# Altium PCB HCD_PCB.PcbDoc (part 1 of 4)
Units mil, origin at the board's own origin, x right, y up, seen from the top; angles counter-clockwise.
Board outline 2762.03 x 3428.03 mil, 2 copper layers (Top Layer, Bottom Layer), stack 57 mil thick; 112 components, 73 nets, 363 pads, 145 vias.
Unrouted connection lines stored in the file: 1.
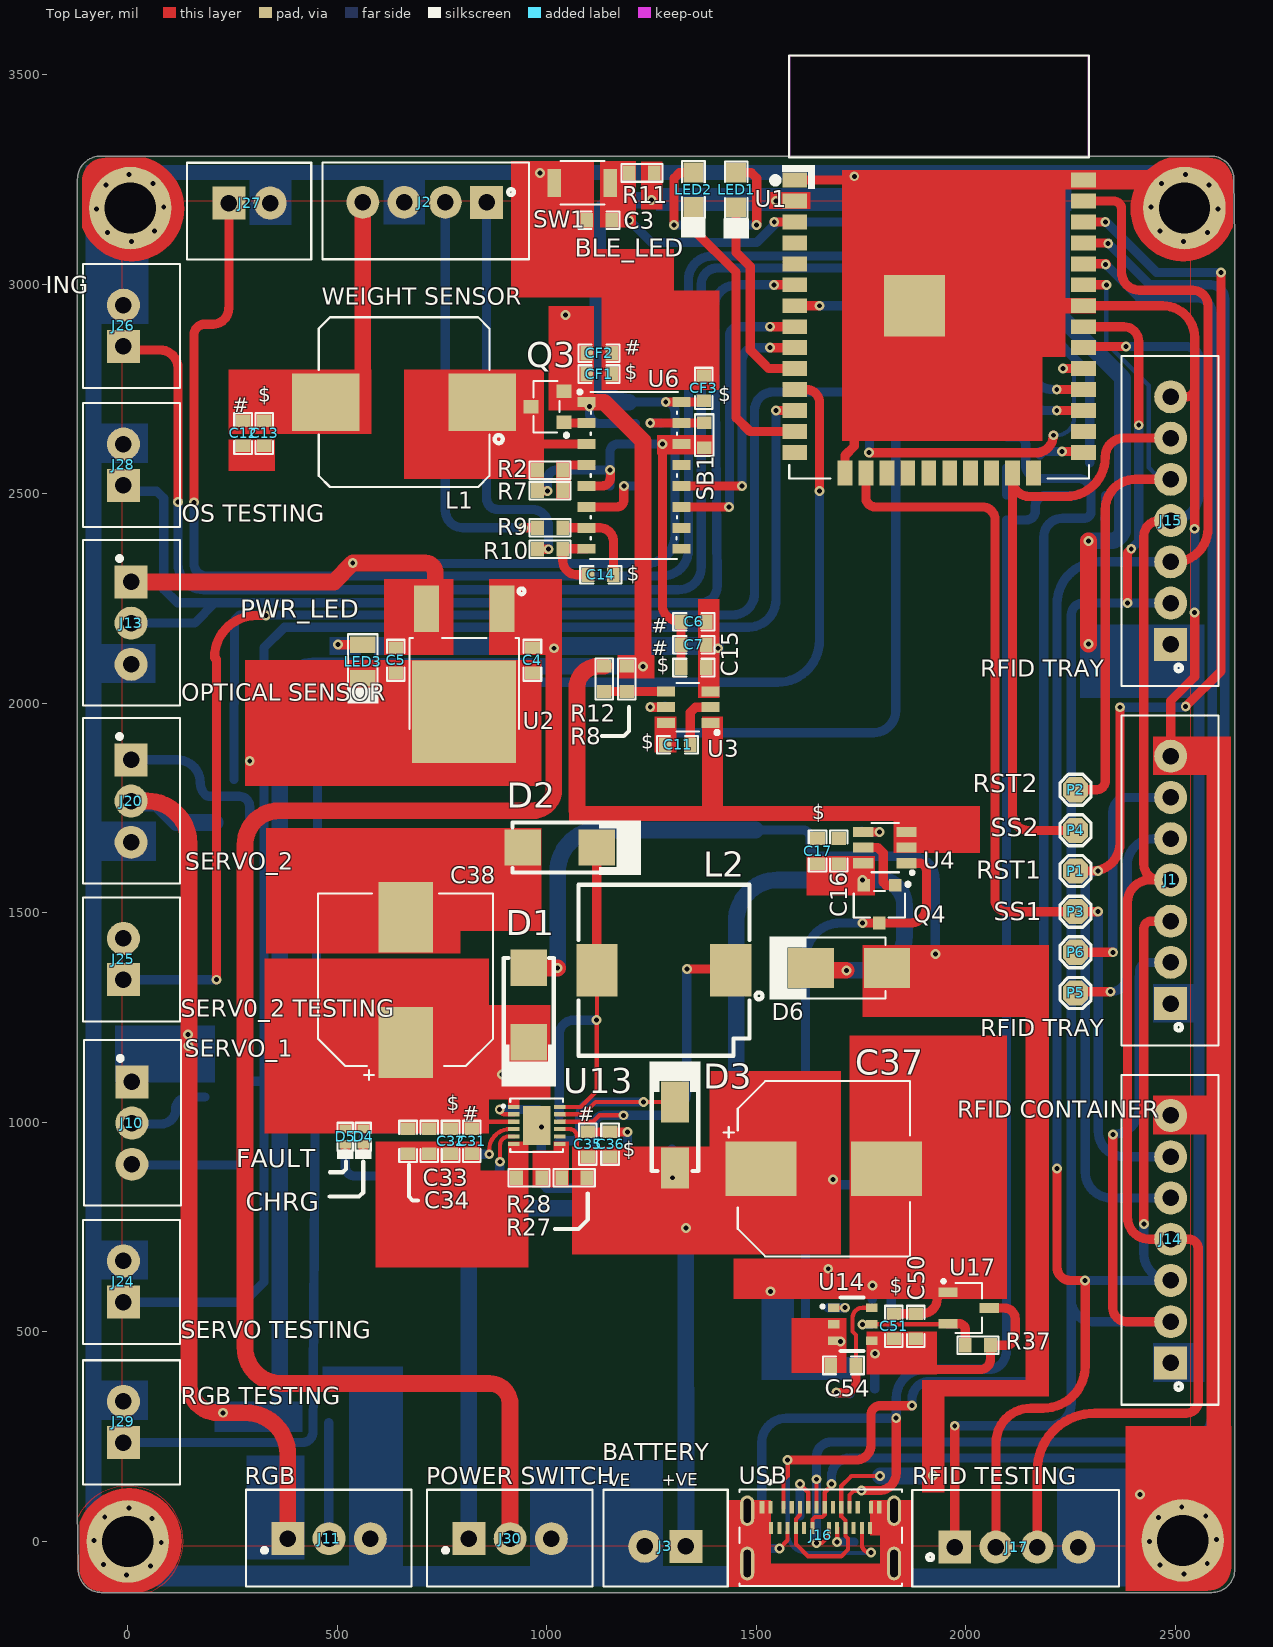
[diagram p0: Top Layer view]
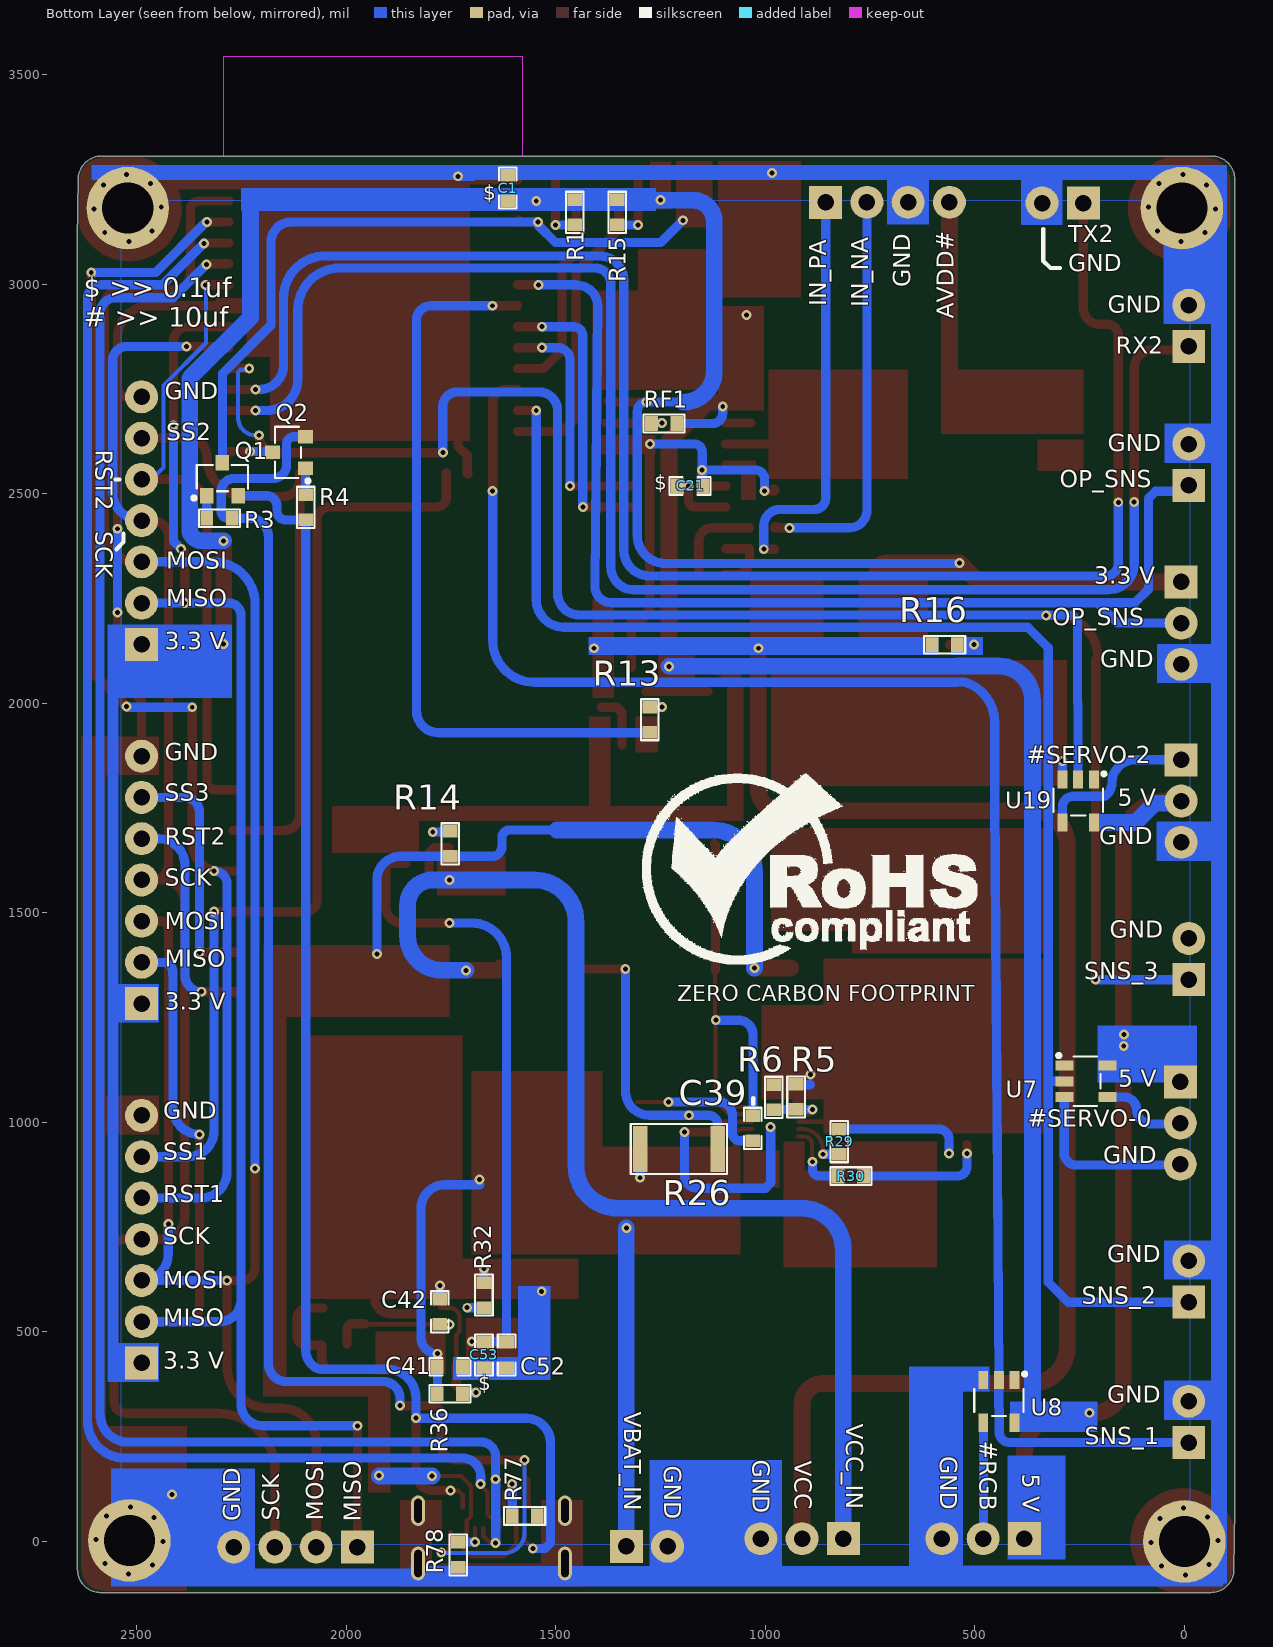
[diagram p1: Bottom Layer view, seen from below]
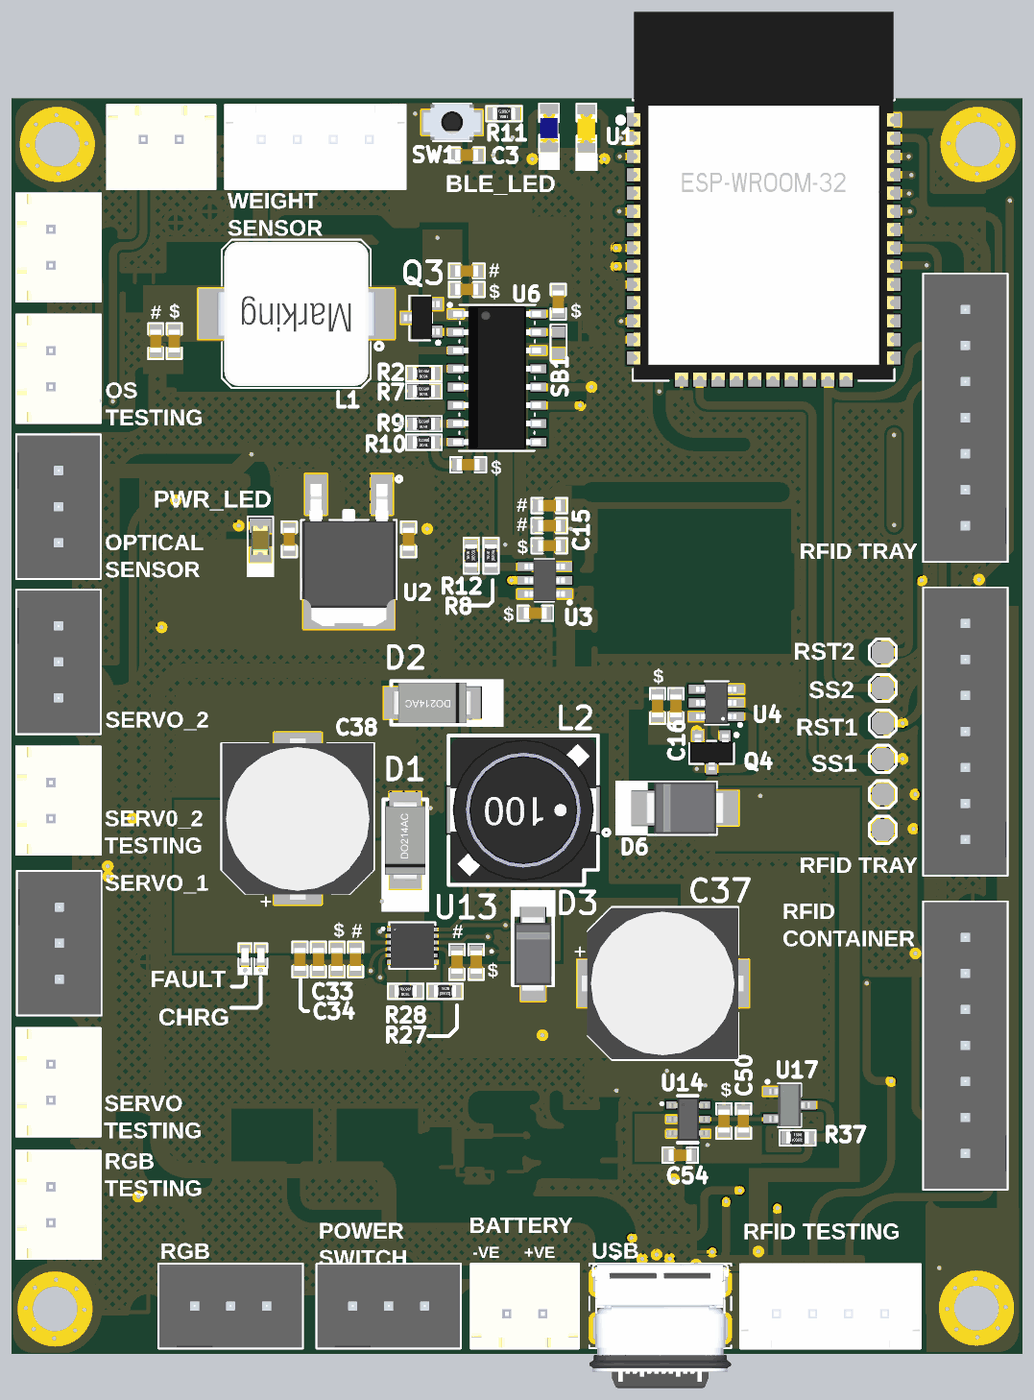
[diagram p3: 3D render of the assembled board from above, using the file's embedded part models]
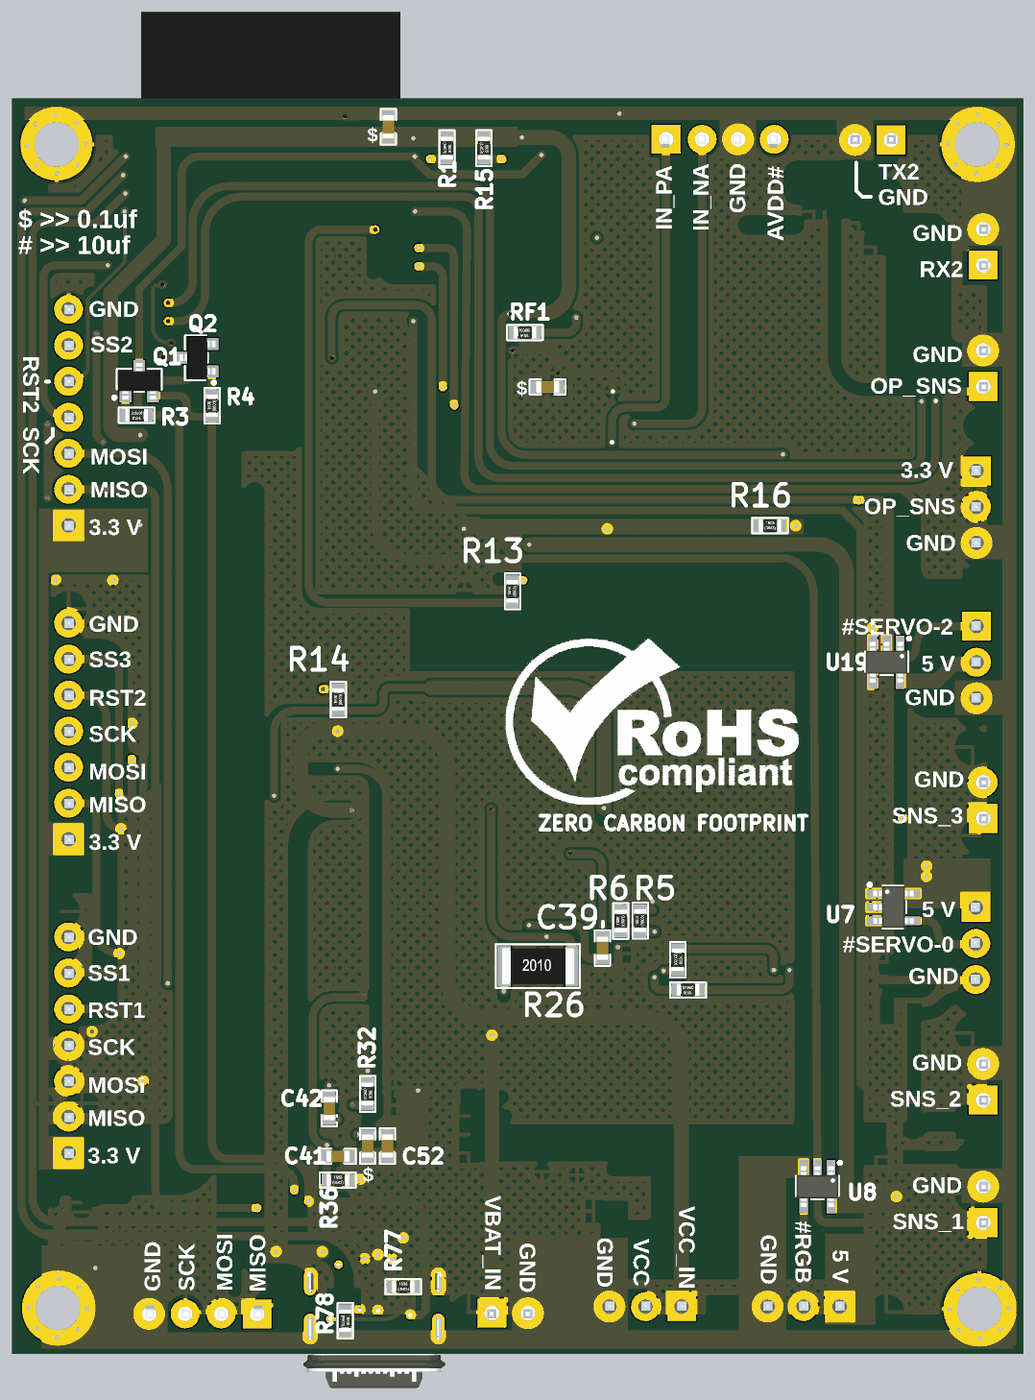
[diagram p4: 3D render of the assembled board from below, using the file's embedded part models]

## Layer stack, top to bottom
Top Solder: solder mask 3, Solder Resist, Dk 3.5
Top Layer: signal copper 10
Dielectric 1: dielectric 37, FR-4, Dk 4.8
Bottom Layer: signal copper 10
Bottom Solder: solder mask 3, Solder Resist, Dk 3.5

## Board outline
-118.02,-67 cw(c-113,-67) -117.99,-66.5 cw(c-113,-66) -118.01,-66.07 -120.01,75.92 cw(c-115,76) -120.01,75.93 -120.01,75.92 -120.01,75.93 cw(c-115,76) -120.02,76 -120.02,3251 cw(c-65,3251) -65,3306.02 2585,3306.02 cw(c2585,3251) 2639.94,3253.86 cw(c2635,3253) 2640.01,3253.05 2642.01,3108.08 2642.01,3108.07 2642.01,3108.08 cw(c2637,3108) 2642.01,3108 2642.01,-67 2642.02,-67 ccw(c2637,-67) 2642.01,-66.97 2642.02,-67 cw(c2587,-67) 2587,-122.02 cw(c2587,-117) 2586,-121.91 cw(c2585,-117) 2585,-122.02 -63,-122.02 cw(c-63,-67)

## Design rules (kind name [scope] priority, off if disabled: settings)
Clearance [All] p1: gap=7 ignorepadtopadclearanceinfootprint=FALSE except(0: Arc-Hole Track-Hole SMDPad-Hole THPad-Hole Via-Hole Fill-Hole Poly-Hole Region-Hole Text-Hole; 3: Arc-SMDPad Track-SMDPad SMDPad-SMDPad)
HoleSize [All] p1: absolutevalues=TRUE maxlimit=200 minlimit=1 maxpercent=80.000 minpercent=20.000
HoleToHoleClearance [All] p1: gap=0 allowstackedmicrovias=TRUE
MinimumSolderMaskSliver [All] p1: minsoldermaskwidth=0
PolygonConnect [All] p1: connectstyle=Relief reliefconductorwidth=10 reliefentries=4 polygonreliefangle="90 Angle" airgapwidth=10
RoutingVias [All] p1: holewidth=11.81 width=23.62 viastyle="Through Hole" minholewidth=11.81 minwidth=23.62 maxholewidth=11.81 maxwidth=23.62
SilkToSilkClearance [All] p1: silktosilkclearance=0
SilkToSolderMaskClearance [IsPad] p1: minsilkscreentomaskgap=0 clearancetoexposedcopper=TRUE
SolderMaskExpansion [All] p1: expansion=4 istentingtop=FALSE
Width [All] p1: maxlimit=40 minlimit=10 preferedwidth=22
25 further rules are at their usual default settings.

## Classes and differential pairs
component class U_MCU_Power_Section: C4 C5 LED3 R16 U2
component class U_Sensor_Section: J1 J10 J11 J14 J15 J17 J20 J24 J25 J29 P1 P2 P3 P4 P5 P6 U7 U8 U19
component class U_Buck_Regulator_Section: C6 C7 C11 C15 C16 C17 D6 Q4 R8 R12 R13 R14 U3 U4
component class U_LiFePo_Charging_Section: C31 C32 C33 C34 C35 C36 C37 C38 C39 D1 D2 D3 D4 D5 L2 R5 R6 R26 R27 R28 R29 R30 U13
component class U_Controller_Section: C1 C3 LED1 LED2 Q1 Q2 R1 R3 R4 R11 R15 SW1 U1
component class U_Connector_Section: J3 J16 J30 R77 R78
component class U_Battery_Management_Section: C41 C42 C50 C51 C52 C53 C54 R32 R36 R37 U14 U17
component class U_Actuator_Section: C12 C13 C14 C21 CF1 CF2 CF3 J2 L1 Q3 R2 R7 R9 R10 RF1 SB1 U6
component class U_Actuator_Section2: J13 J26 J27 J28

## Components (designator, comment, footprint, x,y, rotation, side; value= is the part's Value field where it differs from the comment)
C1 "0.1uF" CAP-0603 1615,3230 r90 bottom
C3 "1uF" CAP-0603 1125,3153 r180 top
C4 "1uF" CAP-0603 966,2103 r270 top
C5 "2.2uF" CAP-0603 640,2103 r270 top
C6 "10uF" CAP-0603 1351,2195 r180 top
C7 "10uF" CAP-0603 1351,2140.25 r180 top
C11 "0.1uF" CAP-0603 1312.38,1901 r180 top
C12 "10uF" CAP-0603 275.15,2644.49 r270 top
C13 "0.1uF" CAP-0603 325.7,2644.49 r270 top
C14 "0.1uF" CAP-0603 1129,2307 r180 top
C15 "0.1uF" CAP-0603 1351,2085.5 r180 top
C16 "1uF" CAP-0603 1696.72,1647.61 r90 top
C17 "0.1uF" CAP-0603 1646.22,1647.61 r90 top
C21 "0.1uF" CAP-0603 1180,2519 r0 bottom
C31 "10uF" CAP-0603 821,955 r270 top
C32 "0.1uF" CAP-0603 770.33,955 r270 top
C33 "4.7uF" CAP-0603 719.67,955 r270 top
C34 "4.7uF" CAP-0603 669,955 r270 top
C35 "10uF" CAP-0603 1098,948 r90 top
C36 "0.1uF" CAP-0603 1151,948 r90 top
C37 "470uF" UCD1E471MNL1GS 1661.39,889.43 r0 top
C38 "470uF" UCD1E471MNL1GS 663,1340 r90 top
C39 "1uF" CAP-0603 1030,986 r90 bottom
C41 "1uF" CAP-0603 1753,417 r180 bottom
C42 "1nF" CAP-0603 1777,548 r90 bottom
C50 "1uF" CAP-0603 1881,513.46 r90 top
C51 "0.1uF" CAP-0603 1828,513.46 r90 top
C52 "1uF" CAP-0603 1617.86,445 r270 bottom
C53 "0.1uF" CAP-0603 1671.86,445 r270 bottom
C54 "1nF" CAP-0603 1708,420 r0 top
CF1 "0.1uF" CAP-0603 1125,2786 r0 top
CF2 "10uF" CAP-0603 1125,2836 r0 top
CF3 "0.1uF" CAP-0603 1375,2752 r90 top
D1 "CMSH3-40MA TR13 PBFREE" DO-214AC 957,1280 r90 top
D2 "CMSH3-40MA TR13 PBFREE" DO-214AC 1030.97,1656 r180 top
D3 "S1A-13-F" SMA 1306,970 r270 top
D4 "XZVG68W-2" "LED 0402" 562,966.28 r270 top
D5 "XZVG68W-2" "LED 0402" 519,966.28 r270 top
D6 "SS54B-HF" SMB 1721.55,1368.58 r180 top
J1 "RFID Tray" B7B-XH-A(LF)(SN) 2489,1578.77 r90 top
J2 "Weight Sensor" B4B-XH-A(LF)(SN) 708.64,3196 r180 top
J3 "B2B-XH-A(LF)(SN)" B2B-XH-A(LF)(SN) 1283,-11.66 r180 top
J10 "WS2812B" B3B-XH-A(LF)(SN) 10,998.57 r270 top
J11 "WS2812B" B3B-XH-A(LF)(SN) 480.57,6.53 r0 top
J13 "Optical Sensor" B3B-XH-A(LF)(SN) 8,2191.57 r270 top
J14 "RFID Container" B7B-XH-A(LF)(SN) 2489,721.26 r90 top
J15 "RFID Tray" B7B-XH-A(LF)(SN) 2489,2436.28 r90 top
J16 "2305018-2" 2305018-2 1653.74,14.28 r0 top locked
J17 "B4B-XH-A(LF)(SN)" B4B-XH-A(LF)(SN) 2121.36,-13.39 r0 top
J20 "WS2812B" B3B-XH-A(LF)(SN) 8,1767 r270 top
J24 "B2B-XH-A(LF)(SN)" B2B-XH-A(LF)(SN) -10.19,620.21 r90 top
J25 "B2B-XH-A(LF)(SN)" B2B-XH-A(LF)(SN) -10.19,1389.79 r90 top
J26 "B2B-XH-A(LF)(SN)" B2B-XH-A(LF)(SN) -10.19,2901.21 r90 top
J27 "B2B-XH-A(LF)(SN)" B2B-XH-A(LF)(SN) 290.79,3194.19 r0 top
J28 "B2B-XH-A(LF)(SN)" B2B-XH-A(LF)(SN) -10.19,2569.79 r90 top
J29 "B2B-XH-A(LF)(SN)" B2B-XH-A(LF)(SN) -10.19,285.21 r90 top
J30 "B3B-XH-A(LF)(SN)" B3B-XH-A(LF)(SN) 912.57,6.53 r0 top
L1 "3.3uH" 74437368033 659.43,2719 r180 top
L2 "10uH" SLF10145T-100M2R5-PF 1279.55,1363 r180 top
LED1 "LTST-C170KSKT" LTST-C170KSKT 1452,3225.34 r270 top
LED2 "17-21/BHC-XL2M2TY/3T" 17-21/BHC-XL2M2TY/3T 1350,3226 r270 top
LED3 "LTST-C171KGKT" "LED 0805" 561,2100 r270 top
P1 "Test Point" "Test point" 2262,1600 r90 top
P2 "Test Point" "Test point" 2262,1794 r90 top
P3 "Test Point" "Test point" 2262,1503 r90 top
P4 "Test Point" "Test point" 2262,1697 r90 top
P5 "Test Point" "Test point" 2262,1309 r0 top
P6 "Test Point" "Test point" 2262,1406 r0 top
Q1 "MMBT2222A-7-F" sot-23 2296,2535 r180 bottom
Q2 "MMBT2222A-7-F" sot-23 2137,2599 r90 bottom
Q3 "MMBT4403LT1G" sot-23 1002,2708 r90 top
Q4 "FDN306P" SuperSOT-3 1794,1521 r180 top
R1 "100R" RES-0603 1455,3172 r90 bottom
R2 "20K" RES-0603 1008,2556.07 r0 top
R3 "10K" RES-0603 2303,2442 r180 bottom
R4 "10K" RES-0603 2097,2468 r270 bottom
R5 "301k" RES-0603 927,1061 r270 bottom
R6 "100K" RES-0603 980,1060 r270 bottom
R7 "8.2K" RES-0603 1008,2508 r0 top
R8 "54.9K" RES-0603 1191,2058.4 r270 top
R9 "100R" RES-0603 1008,2419 r0 top
R10 "100R" RES-0603 1008,2368 r0 top
R11 "10K" RES-0603 1227,3266 r0 top
R12 "10K" RES-0603 1137,2058.4 r270 top
R13 "10K" RES-0603 1276,1961 r270 bottom
R14 "470K" RES-0603 1752,1665 r270 bottom
R15 "100R" RES-0603 1354,3172 r90 bottom
R16 "470R" RES-0603 572.17,2140.25 r0 bottom
R26 "0.05R" "RES 2010" 1206.48,936.48 r180 bottom
R27 "536K" RES-0603 1065.61,868 r180 top
R28 "453K" RES-0603 957.91,868 r0 top
R29 "5.1K" RES-0603 824,954 r90 bottom
R30 "5.1K" RES-0603 796,872 r180 bottom
R32 "10K" RES-0603 1671.86,587.82 r90 bottom
R36 "100K" RES-0603 1753,352.16 r0 bottom
R37 "100K" RES-0603 2029,468 r180 top
R77 "5.1K" RES-0603 1574.53,60.85 r0 bottom
R78 "5.1K" RES-0603 1733,-32 r90 bottom
RF1 "10K" RES-0603 1242,2668 r180 bottom
SB1 "Solder Bridge" "Solder Bridge" 1376,2640 r270 top
SW1 "B3U-1000P" B3U-1000P 1085,3242 r180 top
U1 "ESP32-WROOM-32D (8MB)" "ESP32-WROOM-32D (8MB)" 1936.51,2899.39 r0 top
U2 "LDF33DT-TR" LDF33DT-TR 803,2103 r180 top
U3 "TPS565208DDCT" "SOT 23-6" 1338,1991 r180 top
U4 "LTC4412IS6#TRPBF" TSOT-23-6 1807,1656 r180 top
U6 "HX711" HX711 1208,2544 r0 top
U7 "SN74LV1T34DBVR" SOT-23-5 235,1098 r180 bottom
U8 "SN74LV1T34DBVR" SOT-23-5 442.82,334.43 r270 bottom
U13 "LT3652EDD#PBF" LT3652EDD#PBF 976.12,992.86 r0 top
U14 "SI3865DDV-T1-GE3" 6-TSOP 1730.23,518.41 r0 top
U17 "BD48K50G-TL" SSOP-3 2006.98,557 r270 top
U19 "SN74LV1T34DBVR" SOT-23-5 253.8,1767 r270 bottom

## Footprints (in the part's own frame and the unit in brackets; to place one, negate y for a bottom-side part, rotate by r counter-clockwise, add the part's x,y. Pads: shape width x height; smd on the part's side, far side on the other; paste and mask are expansions set on the pad)
6-TSOP [mil]
  rect 27.52x20 smd: 1(-45.77,39.41) 2(-45.77,0) 3(-45.77,-39.41) 4(45.77,-39.41) 5(45.77,0) 6(45.77,39.41)
  silkscreen extent -74,-64 26,64, body extent -53,-59 53,59, height 39
17-21/BHC-XL2M2TY/3T [mm] "Blue 0805 Light Emitting Diodes (LED) ROHS"
  rect 1.2x1.2 smd: 1(-1.05,0) 2(1.05,0)
  silkscreen extent -1.73,-0.74 2.9,0.74, body extent -1,-0.62 1,0.63, height 1.1
2305018-2 [mm]
  rect 0.25x0.75 smd: A1(-3.05,1.7) A2(-2.25,1.7) A3(-1.75,1.7) A4(-1.25,1.7) A5(-0.75,1.7) A6(-0.25,1.7) A7(0.25,1.7) A8(0.75,1.7) A9(1.25,1.7) A10(1.75,1.7) A11(2.25,1.7) A12(3.05,1.7) B1(3,0.45) B2(2.5,0.45) B3(2,0.45) B4(1.5,0.45) B5(1,0.45) B6(0.5,0.45) B7(-0.5,0.45) B8(-1,0.45) B9(-1.5,0.45) B10(-2,0.45) B11(-2.5,0.45) B12(-3,0.45)
  rect 0.3x0.75 smd: G1(-3.55,1.7) G2(3.55,1.7)
  oval 0.85x2.05 hole 0.45 slot 1.65 at 90 deg: S1(-4.45,-1.7) S2(4.45,-1.7)
  oval 0.85x1.85 hole 0.45 slot 1.45 at 90 deg: S3(4.45,1.5) S4(-4.45,1.5)
  silkscreen extent -4.92,-3.07 4.92,3.33, body extent -4.92,-5.86 4.92,2.79, height 3.53
74437368033 [mm]
  rect 4.1x3.5 smd: 1(-4.75,0) 2(4.75,0)
  silkscreen extent -5.99,-5.15 5.17,5.15, body extent -5.5,-5 5.5,5, height 3.7
B2B-XH-A(LF)(SN) [mm]
  rect 2x2 hole 1: 1(-1.25,0)
  round 2 hole 1: 2(1.25,0)
  silkscreen extent -3.78,-3.43 3.74,2.44, body extent -3.72,-3.37 3.68,2.38, height 7
B3B-XH-A(LF)(SN) [mm]
  rect 2x2 hole 1: 1(-2.5,0)
  round 2 hole 1: 2(0,0) 3(2.5,0)
  silkscreen extent -5.03,-2.9 4.99,2.97, body extent -4.97,-2.84 4.93,2.91, height 7
B3U-1000P [mm] "SWITCH TACTILE SPST-NO 0.05A 12V"
  rect 0.82x1.72 smd: 1(-1.7,0) 2(1.7,0)
  silkscreen extent -1.35,-1.32 1.32,1.3, body extent -2,-1.26 2,1.24, height 1.6
B4B-XH-A(LF)(SN) [mm]
  rect 2x2 hole 1: 1(-3.75,0)
  round 2 hole 1: 2(-1.25,0) 3(1.25,0) 4(3.75,0)
  silkscreen extent -6.32,-2.4 6.2,3.45, body extent -6.26,-2.35 6.14,3.4, height 7
B7B-XH-A(LF)(SN) [mm]
  rect 2x2 hole 1: 1(-7.5,0)
  round 2 hole 1: 2(-5,0) 3(-2.5,0) 4(0,0) 5(2.5,0) 6(5,0) 7(7.5,0)
  silkscreen extent -10.03,-2.9 9.97,2.97, body extent -9.97,-2.84 9.93,2.91, height 7
CAP-0603 [mil]
  rect 30x35 smd mask+2.36: 1(-30,0) 2(30,0)
  silkscreen extent -49,-21 49,21, body extent -32,-16 31,16, height 34
DO-214AC [mm]
  rect 2.21x2.2 smd: 1(-2.25,0) 2(2.25,0)
  silkscreen extent -4.93,-1.65 2.86,1.65, body extent -2.74,-1.4 2.74,1.4, height 2.24
"ESP32-WROOM-32D (8MB)" [mm]
  rect 1.5x0.9 smd: 1(-8.75,8.88) 2(-8.75,7.61) 3(-8.75,6.34) 4(-8.75,5.07) 5(-8.75,3.8) 6(-8.75,2.53) 7(-8.75,1.26) 8(-8.75,-0.01) 9(-8.75,-1.28) 10(-8.75,-2.55) 11(-8.75,-3.82) 12(-8.75,-5.09) 13(-8.75,-6.36) 14(-8.75,-7.63) 25(8.75,-7.63) 26(8.75,-6.36) 27(8.75,-5.09) 28(8.75,-3.82) 29(8.75,-2.55) 30(8.75,-1.28) 31(8.75,-0.01) 32(8.75,1.26) 33(8.75,2.53) 34(8.75,3.8) 35(8.75,5.07) 36(8.75,6.34) 37(8.75,7.61) 38(8.75,8.88)
  rect 0.9x1.5 smd: 15(-5.71,-8.88) 16(-4.44,-8.88) 17(-3.17,-8.88) 18(-1.9,-8.88) 19(-0.63,-8.88) 20(0.64,-8.88) 21(1.91,-8.88) 22(3.18,-8.88) 23(4.45,-8.88) 24(5.72,-8.88)
  rect 3.7x3.7 smd: 39(-1.5,1.26)
  Keep-Out Layer region: -9.042,10.287 9.042,10.287 9.042,16.383 -9.042,16.383
  silkscreen extent -10.06,-9.22 9.09,16.43, body extent -9.04,-9.16 9.04,16.38, height 3
HX711 [mm]
  rect 1.1x0.6 smd: 1(-2.875,4.445) 2(-2.875,3.175) 3(-2.875,1.905) 4(-2.875,0.635) 5(-2.875,-0.635) 6(-2.875,-1.905) 7(-2.875,-3.175) 8(-2.875,-4.445) 9(2.875,-4.445) 10(2.875,-3.175) 11(2.875,-1.905) 12(2.875,-0.635) 13(2.875,0.635) 14(2.875,1.905) 15(2.875,3.175) 16(2.875,4.445)
  silkscreen extent -3.37,-5.06 2.67,5.15, body extent -3.04,-5 3.04,5, height 1.62
LDF33DT-TR [mm]
  rect 1.5x2.8 smd: 1(-2.286,-3.125) 3(2.286,-3.125)
  rect 6.3x6.2 smd: 2(0,3.125)
  silkscreen extent -3.65,-4.36 3.32,4.16, body extent -3.27,-3.84 3.27,6.03, height 2.4
"LED 0402" [mm] "LED BLUE CLEAR CHIP SMD"
  rect 0.5x0.7 smd: 1(-0.47,0) 2(0.47,0)
  silkscreen extent -0.84,-0.51 1.37,0.51, body extent -0.5,-0.25 0.5,0.25, height 0.5
"LED 0805" [mil] "SMD 0805"
  rect 40x60 smd: 1(-40,0) 2(40,0)
  silkscreen extent -65,-37 100,37, body extent -40,-25 40,25, height 43
LT3652EDD#PBF [mm]
  rect 0.7x0.25 smd: 1(-1.4,1.125) 2(-1.4,0.675) 3(-1.4,0.225) 4(-1.4,-0.225) 5(-1.4,-0.675) 6(-1.4,-1.125) 7(1.4,-1.125) 8(1.4,-0.675) 9(1.4,-0.225) 10(1.4,0.225) 11(1.4,0.675) 12(1.4,1.125)
  rect 1.65x2.38 smd: 13(0,0)
  silkscreen extent -2.05,-1.62 1.6,1.62, body extent -1.55,-1.55 1.55,1.55, height 0.8
LTST-C170KSKT [mm] "Yellow 0805 Light Emitting Diodes (LED) ROHS"
  rect 1.2x1.2 smd: 1(-1.05,0) 2(1.05,0)
  silkscreen extent -1.73,-0.76 2.95,0.77, body extent -1,-0.62 1,0.63, height 1.1
"RES 2010" [mm] "RES 50M OHM 1% 3/4W 2010"
  rect 0.9x2.8 smd: 1(-2.35,0) 2(2.35,0)
  silkscreen extent -2.92,-1.52 2.92,1.52, body extent -2.5,-1.25 2.5,1.25, height 0.6
RES-0603 [mil]
  rect 30x35 smd: 1(-30,0) 2(30,0)
  silkscreen extent -49,-21 49,21, body extent -31,-17 31,17, height 18
SLF10145T-100M2R5-PF [mm]
  rect 2.5x3.2 smd: 1(-4.05,0) 2(4.05,0)
  silkscreen extent -5.98,-5.18 5.18,5.18, body extent -5.06,-5.05 5.06,5.05, height 4.5
SMA [mm]
  rect 2.5x1.7 smd: 1(-2,0) 2(2,0)
  silkscreen extent -4.44,-1.55 2.19,1.55, body extent -2.6,-1.3 2.6,1.3, height 2.4
SMB [mm]
  rect 2.8x2.4 smd: 1(-2.3,0) 2(2.3,0)
  silkscreen extent -2.21,-1.9 4.83,1.91, body extent -2.7,-1.8 2.7,1.8, height 2.3
"Solder Bridge" [mil] "Solder Bridge ON"
  rect 30x35 smd: 1(-30,0) 2(30,0)
  silkscreen extent -50,-22 50,22
"SOT 23-6" [mm]
  rect 1.1x0.6 smd: 1(-1.35,0.95) 2(-1.35,0) 3(-1.35,-0.95) 4(1.35,-0.95) 5(1.35,0) 6(1.35,0.95)
  silkscreen extent -1.83,-1.47 0.7,1.63, body extent -1.4,-1.45 1.4,1.45, height 1.1
sot-23 [mm]
  rect 0.82x0.92 smd: 1(-0.95,-1) 2(0.95,-1) 3(0,1)
  silkscreen extent -1.82,-1.23 1.56,0.86, body extent -1.5,-1.25 1.5,1.25, height 1.1
SOT-23-5 [mm]
  rect 1.1x0.6 smd: 1(-1.3,0.95) 2(-1.3,0) 3(-1.3,-0.95) 4(1.3,-0.95) 5(1.3,0.95)
  silkscreen extent -1.74,-1.5 0.88,1.65, body extent -1.4,-1.45 1.4,1.45, height 1.45
SSOP-3 [mm]
  rect 0.59x1.17 smd: 1(-0.95,-1.25) 2(0.95,-1.25) 3(0,1.25)
  silkscreen extent -1.73,-1.62 1.51,0.8, body extent -1.46,-1.4 1.46,1.4, height 1.25
SuperSOT-3 [mm]
  rect 0.76x0.76 smd: 1(-0.95,-1.145) 2(0.95,-1.145) 3(0,1.145)
  silkscreen extent -1.82,-1.29 1.56,0.81, body extent -1.5,-1.25 1.5,1.25, height 1.1
"Test point" [mil]
  oct 60x60 smd: 1(0,0)
  silkscreen extent -37,-37 37,37
TSOT-23-6 [mm]
  rect 1.22x0.62 smd: 1(-1.31,0.95) 2(-1.31,0) 3(-1.31,-0.95) 4(1.31,-0.95) 5(1.31,0) 6(1.31,0.95)
  silkscreen extent -1.73,-1.5 0.81,1.6, body extent -1.4,-1.45 1.4,1.45, height 1
UCD1E471MNL1GS [mm]
  rect 4.3x3.3 smd: 1(-3.8,0) 2(3.8,0)
  silkscreen extent -6.07,-5.31 5.23,5.31, body extent -5.63,-5.24 5.58,5.24, height 10.54

## Part data
C1 C11 C13 C14 C17 C21 C32 C36 C51 C53 CF1 CF3: library part CL10B104KB8NNNL, "CAP CER 0.1UF 50V X7R 0603", Capacitance=100nF, Case/Package=0603, Dielectric=X7R, Manufacturer=Samsung, Max Operating Temperature=125°C, Min Operating Temperature=-55°C, Package Quantity=15000, Supplier Part Number 1=1276-CL10B104KB8NNNLCT-ND, Tolerance=10%, Voltage Rating=50V, ComponentLink1Description=https://www.verical.com/server-webapp/html/getDatasheet?partID=357523&src-supplier=Verical, ComponentLink1URL=https://www.verical.com/server-webapp/html/getDatasheet?partID=357523&src-supplier=Verical, ComponentLink2Description=https://media.digikey.com/pdf/Data%20Sheets/Samsung%20PDFs/CL_Series_MLCC_ds.pdf?src-supplier=Digi-Key, ComponentLink2URL=https://media.digikey.com/pdf/Data%20Sheets/Samsung%20PDFs/CL_Series_MLCC_ds.pdf?src-supplier=Digi-Key, Construction=Flat, Depth=0.8mm, Height=0.8mm, Length=1.6mm, Manufacturer Part Number=CL10B104KB8NNNL, Mount="Surface Mount", Packaging="Tape and Reel", Pricing 1="1=0.1, 10=0.03, 50=0.0164, 100=0.0134, 500=0.00958, 1000=0.00753, 2500=0.00684, 5000=0.0063 (USD)", Radiation Hardening=No, RoHS Compliant=Yes, Series=CL, Stock 1=3731229, Supplier 1=Digi-Key, Thickness=0.035inch, Voltage Rating (DC)=50V, Width=0.031inch
C3 C4 C16 C39 C41 C50 C52: library part CL10A105KA8NNNC, "CAP CER 1UF 25V X5R 0603", Case/Package=0603, Dielectric=X5R, Manufacturer=Sams, Max Operating Temperature=85°C, Min Operating Temperature=-55°C, Supplier Part Number 1=1276-1102-1-ND, Tolerance=10%, Voltage=25V, Capacitance=1uF, Depth=0.8mm, Height=0.8mm, Lead Free="Lead Free", Length=1.6mm, Manufacturer Part Number=CL10A105KA8NNNC, Mount="Surface Mount", Pricing 1="1=0.1, 10=0.036, 50=0.0198, 100=0.0161, 500=0.01152, 1000=0.00904 (USD)", Stock 1=2768758, Supplier 1=Digi-Key, Voltage Rating (DC)=25V
C5: library part CC0603KRX5R8BB225, "CAP CER 2.2UF 25V X5R 0603", Case Code (Imperial)=0603, Case Code (Metric)=1608, Dielectric=X5R, Manufacturer=Yageo, Max Operating Temperature=85°C, Min Operating Temperature=-55°C, Package Quantity=4000, Resistor Type=Ceramic, Supplier Part Number 1=311-1786-1-ND, Tolerance=10%, Voltage Rating=25V, Capacitance=2.2uF, Case/Package=0603, ComponentLink1Description=https://www.verical.com/server-webapp/html/getDatasheet?partID=782757&src-supplier=Verical, ComponentLink1URL=https://www.verical.com/server-webapp/html/getDatasheet?partID=782757&src-supplier=Verical, Depth=0.8mm, Halogen Free="Halogen Free", Lead Free="Lead Free", Length=1.6mm, Manufacturer Part Number=CC0603KRX5R8BB225, Mount="Surface Mount", Packaging="Tape and Reel", Pricing 1="1=0.4, 10=0.276, 50=0.1932, 100=0.1656, 500=0.1242, 1000=0.10488 (USD)", Radiation Hardening=No, RoHS Compliant=Yes, Stock 1=687936, Supplier 1=Digi-Key, Termination=SMD/SMT, Thickness=0.037inch, Voltage Rating (DC)=25V, Weight=7.1E-05oz, Width=0.031inch
C6 C7: library part TMK107BBJ106MA-T, "CAP CER 10UF 25V X5R 0603", Case Code (Imperial)=0603, Case Code (Metric)=1608, Manufacturer="Taiyo Yuden", Max Operating Temperature=85°C, Min Operating Temperature=-55°C, Supplier Part Number 1=587-6023-6-ND, Tolerance=20%, Voltage Rating=25V, Capacitance=10uF, Case/Package=0603, ComponentLink1Description=http://www.farnell.com/datasheets/1824493.pdf?src-supplier=Newark, ComponentLink1URL=http://www.farnell.com/datasheets/1824493.pdf?src-supplier=Newark, ComponentLink2Description=http://www.farnell.com/datasheets/2746429.pdf?src-supplier=Farnell, ComponentLink2URL=http://www.farnell.com/datasheets/2746429.pdf?src-supplier=Farnell, ComponentLink3Description=https://api.kemet.com/component-edge/download/datasheet/C1206C106M3PACTU.pdf?src-supplier=Digi-Key, ComponentLink3URL=https://api.kemet.com/component-edge/download/datasheet/C1206C106M3PACTU.pdf?src-supplier=Digi-Key, ComponentLink4Description=http://www.mouser.com/ds/2/212/KEM_C1006_X5R_SMD-1103249.pdf?src-supplier=Mouser, ComponentLink4URL=http://www.mouser.com/ds/2/212/KEM_C1006_X5R_SMD-1103249.pdf?src-supplier=Mouser, ComponentLink5Description=http://www.farnell.com/datasheets/2746429.pdf?src-supplier=Newark, ComponentLink5URL=http://www.farnell.com/datasheets/2746429.pdf?src-supplier=Newark, ComponentLink6Description=http://www.kemet.com/Lists/ProductCatalog/Attachments/19/KEM_C1006_X5R_SMD.pdf?src-supplier=Avnet, ComponentLink6URL=http://www.kemet.com/Lists/ProductCatalog/Attachments/19/KEM_C1006_X5R_SMD.pdf?src-supplier=Avnet, ComponentLink7Description=http://components.arrow.com/part/dataview/0323_00068823?src-supplier=Arrow+Europe, ComponentLink7URL=http://components.arrow.com/part/dataview/0323_00068823?src-supplier=Arrow+Europe, ComponentLink8Description=http://www.kemet.com/kemet/web/homepage/kechome.nsf/weben/ADB5E2666EC6BA90CA2570A50016092E/$file/KEM_C1005_Y5V_SMD.pdf?src-supplier=Avnet, ComponentLink8URL=http://www.kemet.com/kemet/web/homepage/kechome.nsf/weben/ADB5E2666EC6BA90CA2570A50016092E/$file/KEM_C1005_Y5V_SMD.pdf?src-supplier=Avnet, ComponentLink9Description=http://components.arrow.com/part/dataview/44121590S9544049N7429?src-supplier=Arrow+Electronics, ComponentLink9URL=http://components.arrow.com/part/dataview/44121590S9544049N7429?src-supplier=Arrow+Electronics, ComponentLink10Description=http://ds.yuden.co.jp/TYCOMPAS/ut/detail.do?productNo=TMK107BBJ106MA-T&fileName=TMK107BBJ106MA-T_SS&mode=specSheetDownload&src-supplier=Digi-Key, ComponentLink10URL=http://ds.yuden.co.jp/TYCOMPAS/ut/detail.do?productNo=TMK107BBJ106MA-T&fileName=TMK107BBJ106MA-T_SS&mode=specSheetDownload&src-supplier=Digi-Key, Lead Free="Lead Free", Manufacturer Part Number=TMK107BBJ106MA-T, Mount="Surface Mount", Packaging="Tape and Reel", Pricing 1="1=0.46, 10=0.32, 50=0.2238, 100=0.1918, 500=0.14386, 1000=0.12149 (USD)", RoHS Compliant=Yes, Stock 1=83542, Supplier 1=Digi-Key
C12 C31 C35: library part TMK107BBJ106MA-T, "CAP CER 10UF 25V X5R 0603", Case Code (Imperial)=0603, Case Code (Metric)=1608, Manufacturer="Taiyo Yuden", Max Operating Temperature=85°C, Min Operating Temperature=-55°C, Supplier Part Number 1=587-6023-1-ND, Tolerance=20%, Voltage Rating=25V, Capacitance=10uF, Case/Package=0603, ComponentLink1Description=http://ds.yuden.co.jp/TYCOMPAS/ut/detail.do?productNo=TMK107BBJ106MA-T&fileName=TMK107BBJ106MA-T_SS&mode=specSheetDownload&src-supplier=Digi-Key, ComponentLink1URL=http://ds.yuden.co.jp/TYCOMPAS/ut/detail.do?productNo=TMK107BBJ106MA-T&fileName=TMK107BBJ106MA-T_SS&mode=specSheetDownload&src-supplier=Digi-Key, Lead Free="Lead Free", Manufacturer Part Number=TMK107BBJ106MA-T, Mount="Surface Mount", Packaging="Tape and Reel", Pricing 1="1=0.46, 10=0.32, 50=0.2238, 100=0.1918, 500=0.14386, 1000=0.12149 (USD)", RoHS Compliant=Yes, Stock 1=85333, Supplier 1=Digi-Key
C15: library part CL10B104KB8NNNL, "CAP CER 0.1UF 50V X7R 0603", Capacitance=100nF, Case/Package=0603, Dielectric=X7R, Manufacturer=Samsung, Max Operating Temperature=125°C, Min Operating Temperature=-55°C, Package Quantity=15000, Supplier Part Number 1=1276-CL10B104KB8NNNLDKR-ND, Tolerance=10%, Voltage Rating=50V, ComponentLink1Description=https://www.verical.com/server-webapp/html/getDatasheet?partID=357523&src-supplier=Verical, ComponentLink1URL=https://www.verical.com/server-webapp/html/getDatasheet?partID=357523&src-supplier=Verical, ComponentLink2Description=https://media.digikey.com/pdf/Data%20Sheets/Samsung%20PDFs/CL_Series_MLCC_ds.pdf?src-supplier=Digi-Key, ComponentLink2URL=https://media.digikey.com/pdf/Data%20Sheets/Samsung%20PDFs/CL_Series_MLCC_ds.pdf?src-supplier=Digi-Key, Construction=Flat, Depth=0.8mm, Height=0.8mm, Length=1.6mm, Manufacturer Part Number=CL10B104KB8NNNL, Mount="Surface Mount", Packaging="Tape and Reel", Pricing 1="1=0.1, 10=0.03, 50=0.0164, 100=0.0134, 500=0.00958, 1000=0.00753, 2500=0.00684, 5000=0.0063 (USD)", Radiation Hardening=No, RoHS Compliant=Yes, Series=CL, Stock 1=4119803, Supplier 1=Digi-Key, Thickness=0.035inch, Voltage Rating (DC)=50V, Width=0.031inch
C33 C34: library part CL10A475KA8NQNC, "CAP CER 4.7UF 25V X5R 0603", Case Code (Imperial)=0603, Case Code (Metric)=1608, Dielectric=X5R, Manufacturer=Samsung, Max Operating Temperature=85°C, Min Operating Temperature=-55°C, Package Quantity=1, Supplier Part Number 1=1276-1900-6-ND, Tolerance=10%, Voltage Rating=25V, Capacitance=4.7uF, Case/Package=0603, ComponentLink1Description=http://www.samsungsem.com/kr/support/product-search/mlcc/CL10A475KA8NQNC.jsp?src-supplier=Digi-Key, ComponentLink1URL=http://www.samsungsem.com/kr/support/product-search/mlcc/CL10A475KA8NQNC.jsp?src-supplier=Digi-Key, Construction=Flat, Contact Plating=Tin, Depth=0.8mm, Lead Free="Lead Free", Length=1.6mm, Manufacturer Part Number=CL10A475KA8NQNC, Mount="Surface Mount", Packaging="Tape and Reel", Pricing 1="1=0.37, 10=0.255, 50=0.1784, 100=0.1528, 500=0.11462, 1000=0.0968 (USD)", RoHS Compliant=Yes, Series=CL, Stock 1=345169, Supplier 1=Digi-Key, Termination=Wraparound, Thickness=0.035inch, Width=0.031inch
C37 C38: library part UCD1E471MNL1GS, "CAP ALUM 470UF 20% 25V SMD", Case/Package=Radial, Leakage Current=3uA, Manufacturer=Nichicon, Max Operating Temperature=105°C, Min Operating Temperature=-55°C, Package Quantity=1, Ripple Current=850mA, Supplier Part Number 1=493-6386-1-ND, Tolerance=20%, Voltage=25V, Capacitance=470uF, ComponentLink1Description=http://nichicon-us.com/english/products/pdfs/e-ucd.pdf?src-supplier=Digi-Key, ComponentLink1URL=http://nichicon-us.com/english/products/pdfs/e-ucd.pdf?src-supplier=Digi-Key, ComponentLink2Description=http://www.mouser.com/ds/2/293/e-cd-22158.pdf?src-supplier=Mouser, ComponentLink2URL=http://www.mouser.com/ds/2/293/e-cd-22158.pdf?src-supplier=Mouser, ComponentLink3Description=http://uk.rs-online.com/webdocs/0ebd/0900766b80ebdadd.pdf?src-supplier=RSComponents, ComponentLink3URL=http://uk.rs-online.com/webdocs/0ebd/0900766b80ebdadd.pdf?src-supplier=RSComponents, ComponentLink4Description=http://www.nichicon.co.jp/english/products/pdfs/e-cd.pdf?src-supplier=Avnet, ComponentLink4URL=http://www.nichicon.co.jp/english/products/pdfs/e-cd.pdf?src-supplier=Avnet, ComponentLink5Description=http://products.nichicon.co.jp/en/pdf/XJA043/e-cd.pdf?src-supplier=Future+Electronics, ComponentLink5URL=http://products.nichicon.co.jp/en/pdf/XJA043/e-cd.pdf?src-supplier=Future+Electronics, ComponentLink6Description=https://www.verical.com/server-webapp/html/getDatasheet?partID=512790&src-supplier=Verical, ComponentLink6URL=https://www.verical.com/server-webapp/html/getDatasheet?partID=512790&src-supplier=Verical, ComponentLink7Description=http://www.nichicon.co.jp/english/products/pdfs/e-cd.pdf?src-supplier=Avnet+Europe, ComponentLink7URL=http://www.nichicon.co.jp/english/products/pdfs/e-cd.pdf?src-supplier=Avnet+Europe, Construction=Cylindrical, Diameter=10mm, Dissipation Factor=0.14%, Features="General Purpose", Height=10mm, Height - Seated (Max)=0.394inch, Impedance=80mR, Length=10mm, Life (Hours)=5000Hour, Manufacturer Part Number=UCD1E471MNL1GS, Mount="Surface Mount,PCB", Packaging="Tape and Reel", Pricing 1="1=0.96, 10=0.708, 50=0.566, 100=0.4852 (USD)", Radiation Hardening=No, RoHS Compliant=Yes, Series=CD, Stock 1=0, Supplier 1=Digi-Key, Termination=SMD/SMT, Voltage Rating=25V, Voltage Rating (DC)=25V
C42 C54: library part CC0603JRNPO8BN102, "CAP CER 1000PF 25V C0G/NPO 0603", Case/Package=0603, Case Code (Metric)=1608, Dielectric=C0G, Manufacturer=Yageo, Max Operating Temperature=125°C, Min Operating Temperature=-55°C, Package Quantity=1, Supplier Part Number 1=311-1342-1-ND, Tolerance=5%, Voltage Rating=25V, Capacitance=1nF, Case Code (Imperial)=0603, ComponentLink1Description=http://www.farnell.com/datasheets/1132289.pdf?src-supplier=Element14, ComponentLink1URL=http://www.farnell.com/datasheets/1132289.pdf?src-supplier=Element14, ComponentLink2Description=http://www.farnell.com/datasheets/2213336.pdf?src-supplier=Element14, ComponentLink2URL=http://www.farnell.com/datasheets/2213336.pdf?src-supplier=Element14, ComponentLink3Description=http://www.yageo.com/documents/recent/UPY-GP_NP0_16V-to-50V_16.pdf?src-supplier=Digi-Key, ComponentLink3URL=http://www.yageo.com/documents/recent/UPY-GP_NP0_16V-to-50V_16.pdf?src-supplier=Digi-Key, ComponentLink4Description=http://www.yageo.com/exep/pages/download/literatures/ProductSelectionGuide%202014_Final_2.pdf?src-supplier=Digi-Key, ComponentLink4URL=http://www.yageo.com/exep/pages/download/literatures/ProductSelectionGuide%202014_Final_2.pdf?src-supplier=Digi-Key, ComponentLink5Description=http://www.yageo.com/documents/recent/UPY-GP_NP0_16V-to-50V_8.pdf?src-supplier=Avnet, ComponentLink5URL=http://www.yageo.com/documents/recent/UPY-GP_NP0_16V-to-50V_8.pdf?src-supplier=Avnet, ComponentLink6Description=https://www.verical.com/server-webapp/html/getDatasheet?partID=403523&src-supplier=Verical, ComponentLink6URL=https://www.verical.com/server-webapp/html/getDatasheet?partID=403523&src-supplier=Verical, ComponentLink7Description=http://www.yageo.com/documents/recent/UPY-GP_NP0_16V-to-50V_8.pdf?src-supplier=Avnet+Europe, ComponentLink7URL=http://www.yageo.com/documents/recent/UPY-GP_NP0_16V-to-50V_8.pdf?src-supplier=Avnet+Europe, Construction=Flat, Depth=0.8mm, Height=0.8mm, Lead Free="Lead Free", Length=1.6mm, Manufacturer Part Number=CC0603JRNPO8BN102, Mount="Surface Mount", Packaging="Tape and Reel", Pricing 1="1=0.1, 10=0.072, 50=0.0394, 100=0.0322, 500=0.02298, 1000=0.01806 (USD)", Radiation Hardening=No, REACH SVHC=Unknown, RoHS Compliant=Yes, Series=CC, Stock 1=290818, Supplier 1=Digi-Key, Termination=SMD/SMT, Thickness=0.035inch, Voltage Rating (DC)=25V, Width=0.031inch
CF2: library part TMK107BBJ106MA-T, "CAP CER 10UF 25V X5R 0603", Case/Package=0603, Case Code (Metric)=1608, Manufacturer="Taiyo Yuden", Max Operating Temperature=85°C, Min Operating Temperature=-55°C, Supplier Part Number 1=587-6023-1-ND, Tolerance=20%, Voltage Rating=25V, Capacitance=10uF, Case Code (Imperial)=0603, ComponentLink1Description=http://ds.yuden.co.jp/TYCOMPAS/ut/detail.do?productNo=TMK107BBJ106MA-T&fileName=TMK107BBJ106MA-T_SS&mode=specSheetDownload&src-supplier=Digi-Key, ComponentLink1URL=http://ds.yuden.co.jp/TYCOMPAS/ut/detail.do?productNo=TMK107BBJ106MA-T&fileName=TMK107BBJ106MA-T_SS&mode=specSheetDownload&src-supplier=Digi-Key, Lead Free="Lead Free", Manufacturer Part Number=TMK107BBJ106MA-T, Mount="Surface Mount", Packaging="Tape and Reel", Pricing 1="1=0.46, 10=0.32, 50=0.2238, 100=0.1918, 500=0.14386, 1000=0.12149 (USD)", RoHS Compliant=Yes, Stock 1=85333, Supplier 1=Digi-Key
D1 D2: "DIODE SCHOTTKY 40V 3A SMA", Manufacturer="Central Semiconductor", Supplier Part Number 1=1514-CMSH3-40MATR13PBFREEDKR-ND, Manufacturer Part Number="CMSH3-40MA TR13 PBFREE", Pricing 1="1=0.67, 10=0.592, 100=0.4536, 500=0.3586, 1000=0.28688, 2000=0.25999 (USD)", RoHS Compliant=Yes, Stock 1=27620, Supplier 1=Digi-Key
D3: "Diode Switching 50V 1A 2-Pin SMA T/R", Average Rectified Current=1A, Capacitance=10pF, Case/Package=SMA, Forward Voltage=1.1V, Manufacturer=Diodes, Max Forward Surge Current (Ifsm)=30A, Max Operating Temperature=150°C, Max Repetitive Reverse Voltage (Vrrm)=50V, Max Reverse Current=5uA, Min Operating Temperature=-65°C, Package Quantity=5000, Supplier Part Number 1=S1A-FDICT-ND, Category="Rectifier Diodes", ComponentLink1Description=http://www.mouser.com/ds/2/115/ds16008-60440.pdf?src-supplier=Mouser, ComponentLink1URL=http://www.mouser.com/ds/2/115/ds16008-60440.pdf?src-supplier=Mouser, ComponentLink2Description=http://www.diodes.com///datasheets/ds16008.pdf?src-supplier=Avnet, ComponentLink2URL=http://www.diodes.com///datasheets/ds16008.pdf?src-supplier=Avnet, ComponentLink3Description=http://www.te.com/commerce/DocumentDelivery/DDEController?Action=showdoc&DocId=Data+Sheet%7FRPII%2F2%7F0415%7Fpdf%7FEnglish%7FENG_DS_RPIIX2_0415.pdf&src-supplier=Digi-Key, ComponentLink3URL=http://www.te.com/commerce/DocumentDelivery/DDEController?Action=showdoc&DocId=Data+Sheet%7FRPII%2F2%7F0415%7Fpdf%7FEnglish%7FENG_DS_RPIIX2_0415.pdf&src-supplier=Digi-Key, ComponentLink4Description=https://www.diodes.com/assets/Datasheets/ds16008.pdf?src-supplier=Digi-Key, ComponentLink4URL=https://www.diodes.com/assets/Datasheets/ds16008.pdf?src-supplier=Digi-Key, ComponentLink5Description=https://datasheet.ciiva.com/911/ds16003-911872.pdf?src-supplier=Digi-Key, ComponentLink5URL=https://datasheet.ciiva.com/911/ds16003-911872.pdf?src-supplier=Digi-Key, ComponentLink6Description=https://datasheet.ciiva.com/27052/1541520-27052419.pdf?src-supplier=Jameco, ComponentLink6URL=https://datasheet.ciiva.com/27052/1541520-27052419.pdf?src-supplier=Jameco, ComponentLink7Description=https://datasheet.ciiva.com/22695/1911706-22695830.pdf?src-supplier=Element14, ComponentLink7URL=https://datasheet.ciiva.com/22695/1911706-22695830.pdf?src-supplier=Element14, ComponentLink8Description=https://datasheet.ciiva.com/16199/ds16003-16199336.pdf?src-supplier=Future+Electronics, ComponentLink8URL=https://datasheet.ciiva.com/16199/ds16003-16199336.pdf?src-supplier=Future+Electronics, ComponentLink9Description=https://datasheet.ciiva.com/4453/ds16003-83672-4453580.pdf?src-supplier=Mouser, ComponentLink9URL=https://datasheet.ciiva.com/4453/ds16003-83672-4453580.pdf?src-supplier=Mouser, ComponentLink10Description=https://datasheet.ciiva.com/25953/ds16003-25953033.pdf?src-supplier=Avnet+Europe, ComponentLink10URL=https://datasheet.ciiva.com/25953/ds16003-25953033.pdf?src-supplier=Avnet+Europe, ComponentLink11Description=https://datasheet.ciiva.com/8301/ds16003-8301429.pdf?src-supplier=Avnet, ComponentLink11URL=https://datasheet.ciiva.com/8301/ds16003-8301429.pdf?src-supplier=Avnet, Current Rating=1A, Element Configuration=Single, Forward Current=1A, Height=2.1mm, Lead Free="Lead Free", Length=4.6mm, Manufacturer Part Number=S1A-13-F, Max Reverse Voltage (DC)=50V, Max Surge Current=30A, Mount="Surface Mount", Number of Pins=2, Output Current=1A, Packaging="Tape and Reel", Peak Non-Repetitive Surge Current=30A, Polarity=Standard, Pricing 1="1=0.26000, 10=0.21300, 100=0.11290, 500=0.07424, 1000=0.05049, 2000=0.04554 (USD)", Radiation Hardening=No, REACH SVHC="No SVHC", Recovery Time=1.8us, Reverse Recovery Time=3us, Reverse Voltage (DC)=50V, RoHS=Yes, RoHS Compliant=Yes, Series=-, Stock 1=647079, Supplier 1=Digi-Key, Termination=SMD/SMT, Voltage Rating (DC)=50V, Weight=0.002258oz, Width=2.92mm
D4 D5: "LED GREEN CLEAR CHIP SMD", Case Code (Imperial)=0402, Case Code (Metric)=1005, Color=Green, Forward Voltage=2.1V, Lens Color=Colorless, Manufacturer=SunLED, Supplier Part Number 1=1497-1219-6-ND, Test Current=20mA, Case/Package=0402, ComponentLink1Description=https://www.sunledusa.com/products/spec/XZVG68W-2.pdf?src-supplier=Digi-Key, ComponentLink1URL=https://www.sunledusa.com/products/spec/XZVG68W-2.pdf?src-supplier=Digi-Key, ComponentLink2Description=http://www.sunledusa.com/products/spec/XZVG68W-2.pdf?src-supplier=Digi-Key, ComponentLink2URL=http://www.sunledusa.com/products/spec/XZVG68W-2.pdf?src-supplier=Digi-Key, Dominant Wavelength=570nm, Height=0.6mm, Length=1mm, Lens Transparency=Clear, Luminous Intensity=49mcd, Manufacturer Part Number=XZVG68W-2, Mount="Surface Mount", Packaging="Tape and Reel", Pricing 1="1=0.37, 10=0.293, 100=0.1314, 500=0.11872, 1000=0.09752 (USD)", RoHS Compliant=Yes, Stock 1=122154, Supplier 1=Digi-Key, Viewing Angle=120°, Width=0.5mm
D6: "DIODE SCHOTTKY 5A 40V SMB", Manufacturer=Comchip, Supplier Part Number 1=750-SS54B-HF, Manufacturer Part Number=SS54B-HF, Pricing 1="1=0.56000, 10=0.32900, 50=0.32900, 100=0.17100, 1000=0.11900, 10000=0.09000 (USD)", RoHS=No, Stock 1=2862, Supplier 1=Mouser
J1 J14 J15: library part B7B-XH-A(LF)(SN), "CONN HEADER VERT 7POS 2.5MM", Color=Natural, Contact Resistance=20mR, Current Rating=3A, Flammability Rating="UL94 V-0", Housing Color=White, Insulation Resistance=1GR, Manufacturer=JST, Max Operating Temperature=85°C, Max Voltage Rating (AC)=250V, Min Operating Temperature=-25°C, Supplier Part Number 1=455-2252-ND, ComponentLink1Description=https://www.verical.com/server-webapp/html/getDatasheet?partID=440406&src-supplier=Verical, ComponentLink1URL=https://www.verical.com/server-webapp/html/getDatasheet?partID=440406&src-supplier=Verical, Connector Type=Header, Contact Finish - Mating=TIN, Contact Material=Brass, Contact Plating=Copper,Tin,Lead, Contact Shape=Square, Contact Type="Male Pin", Depth=5.75mm, Fastening Type=Detent, Housing Material=Polyamide, Insulation Color=Natural, Insulation Material=Nylon, Lead Free="Lead Free", Lead Pitch=2.5mm, Length=19.9mm, Manufacturer Part Number=B7B-XH-A(LF)(SN), Max Current Rating=3A, Mount="Through Hole", Number of Contacts=7, Number of Positions=7, Number of Rows=1, Orientation=Straight, Packaging=Bulk, Pitch=2.5mm, REACH SVHC="No SVHC", Series=XH, Stock 1=0, Supplier 1=Digi-Key, Termination=Solder, Voltage Rating=250V, Voltage Rating (AC)=250V, Wire/Cable Gauge=22AWG
J2: library part B4B-XH-A(LF)(SN), "CONN HEADER VERT 4POS 2.5MM", Color=Natural, Contact Resistance=20mR, Current Rating=3A, Housing Color=White, Insulation Resistance=1GR, Manufacturer=JST, Max Operating Temperature=85°C, Max Voltage Rating (AC)=250V, Min Operating Temperature=-25°C, Package Quantity=500, Supplier Part Number 1=455-2249-ND, ComponentLink1Description=http://www.jst-mfg.com/product/pdf/eng/eXH.pdf?src-supplier=Digi-Key, ComponentLink1URL=http://www.jst-mfg.com/product/pdf/eng/eXH.pdf?src-supplier=Digi-Key, ComponentLink2Description=https://www.verical.com/server-webapp/html/getDatasheet?partID=640571&src-supplier=Verical, ComponentLink2URL=https://www.verical.com/server-webapp/html/getDatasheet?partID=640571&src-supplier=Verical, ComponentLink3Description=http://www.jst-mfg.com/product/pdf/eng/eXH.pdf?src-supplier=Future+Electronics, ComponentLink3URL=http://www.jst-mfg.com/product/pdf/eng/eXH.pdf?src-supplier=Future+Electronics, ComponentLink4Description=https://www.verical.com/server-webapp/html/getDatasheet?partID=455616&src-supplier=Verical, ComponentLink4URL=https://www.verical.com/server-webapp/html/getDatasheet?partID=455616&src-supplier=Verical, Connector Type="Male Pin", Contact Material=Brass, Contact Plating=Tin,Copper,Lead, Contact Type="Male Pin", Depth=5.75mm, Gender=Male, Housing Material=Polyamide, Lead Free="Lead Free", Lead Pitch=2.5mm, Length=12.4mm, Manufacturer Part Number=B4B-XH-A(LF)(SN), Material=Polyamide, Max Current Rating=3A, Max Voltage Rating (DC)=250V, Mount="Through Hole", Number of Contacts=4, Number of Positions=4, Number of Rows=1, Orientation=Straight, Packaging=Bulk, Pitch=2.5mm, REACH SVHC="No SVHC", Series=XH, Stock 1=0, Supplier 1=Digi-Key, Termination=Press-Fit, Voltage Rating=250V, Voltage Rating (AC)=250V, Wire/Cable Gauge=22AWG
J3 J24 J25 J26 J27 J28 J29: "Conn Shrouded Header (4 Sides) HDR 2 POS 2.5mm Solder ST Thru-Hole Box", Color=Natural, Contact Resistance=20mR, Current Rating=3A, Housing Color=White, Insulation Resistance=1GR, Manufacturer=JST, Max Operating Temperature=85°C, Max Voltage Rating (AC)=250V, Min Operating Temperature=-25°C, Supplier Part Number 1=1516276, Category="FFC / FPC", ComponentLink1Description=https://datasheet.ciiva.com/26894/getdatasheetpartid-640357-26894434.pdf?src-supplier=Verical, ComponentLink1URL=https://datasheet.ciiva.com/26894/getdatasheetpartid-640357-26894434.pdf?src-supplier=Verical, ComponentLink2Description=https://datasheet.ciiva.com/11746/0900766b8082653e-11746979.pdf?src-supplier=RSComponents, ComponentLink2URL=https://datasheet.ciiva.com/11746/0900766b8082653e-11746979.pdf?src-supplier=RSComponents, ComponentLink3Description=https://datasheet.ciiva.com/26894/getdatasheetpartid-385291-26894760.pdf?src-supplier=Verical, ComponentLink3URL=https://datasheet.ciiva.com/26894/getdatasheetpartid-385291-26894760.pdf?src-supplier=Verical, ComponentLink4Description=https://datasheet.ciiva.com/8052/5448-8052024.pdf?src-supplier=Element14, ComponentLink4URL=https://datasheet.ciiva.com/8052/5448-8052024.pdf?src-supplier=Element14, ComponentLink5Description=https://datasheet.ciiva.com/20207/523653-20207167.pdf?src-supplier=Rapid+Electronics, ComponentLink5URL=https://datasheet.ciiva.com/20207/523653-20207167.pdf?src-supplier=Rapid+Electronics, Connector Type="Male Pin", Contact Material=Brass, Contact Plating=Tin,Copper,Lead, Depth=5.75mm, Fastening Type=Detent, Housing Material=Polyamide, Lead Free="Lead Free", Lead Pitch=2.5mm, Length=7.4mm, Manufacturer Part Number=B2B-XH-A(LF)(SN), Max Current Rating=3A, Max Voltage Rating (DC)=250V, Mount="Through Hole", Number of Contacts=2, Number of Positions=2, Number of Rows=1, Orientation=Straight, Packaging=Bulk, Pitch=2.5mm, Pricing 1="100=0.06860, 1000=0.04800, 2500=0.04520, 5000=0.04230, 10000=0.03950, 20000=0.03660 (GBP)", REACH SVHC="No SVHC", RoHS=Yes, Stock 1=219240, Supplier 1=Farnell, Termination=Solder, Voltage Rating=250V, Voltage Rating (AC)=250V, Wire/Cable Gauge=22AWG
J10 J11 J13 J20: library part B3B-XH-A(LF)(SN), "CONN HEADER VERT 3POS 2.5MM", Color=Natural, Contact Resistance=20mR, Current Rating=3A, Flammability Rating="UL94 V-0", Housing Color=White, Insulation Resistance=1GR, Manufacturer=JST, Max Operating Temperature=85°C, Max Voltage Rating (AC)=250V, Min Operating Temperature=-25°C, Supplier Part Number 1=455-2248-ND, ComponentLink1Description=https://www.verical.com/server-webapp/html/getDatasheet?partID=640434&src-supplier=Verical, ComponentLink1URL=https://www.verical.com/server-webapp/html/getDatasheet?partID=640434&src-supplier=Verical, ComponentLink2Description=https://www.verical.com/server-webapp/html/getDatasheet?partID=440399&src-supplier=Verical, ComponentLink2URL=https://www.verical.com/server-webapp/html/getDatasheet?partID=440399&src-supplier=Verical, Connector Type=Header, Contact Finish - Mating=TIN, Contact Material=Brass, Contact Plating=Tin,Lead,Copper, Contact Shape=Square, Contact Type="Male Pin", Depth=5.75mm, Fastening Type=Detent, Gender=Male, Housing Material=Polyamide, Insulation Color=Natural, Insulation Material=Nylon, Lead Free="Lead Free", Lead Pitch=2.5mm, Length=9.9mm, Manufacturer Part Number=B3B-XH-A(LF)(SN), Max Current Rating=3A, Max Voltage Rating (DC)=250V, Mount="Through Hole", Number of Contacts=3, Number of Positions=3, Number of Rows=1, Orientation=Straight, Packaging=Bulk, Pitch=2.5mm, Pricing 1="1=0.19, 10=0.181, 25=0.1344, 50=0.1154, 250=0.09612, 750=0.08652, 1000=0.08075, 12000=0.06152, 24000=0.05575 (USD)", REACH SVHC="No SVHC", Series=XH, Stock 1=3453, Supplier 1=Digi-Key, Termination=Solder, Voltage Rating=250V, Voltage Rating (AC)=250V, Wire/Cable Gauge=22AWG
J16: "CONN RCP USB3.1 TYPEC 24P SMD RA"
J17: "CONN HEADER VERT 4POS 2.5MM", Color=Natural, Contact Resistance=20mR, Current Rating=3A, Housing Color=White, Insulation Resistance=1GR, Manufacturer=JST, Max Operating Temperature=85°C, Max Voltage Rating (AC)=250V, Min Operating Temperature=-25°C, Package Quantity=500, Supplier Part Number 1=455-2249-ND, ComponentLink1Description=http://www.jst-mfg.com/product/pdf/eng/eXH.pdf?src-supplier=Digi-Key, ComponentLink1URL=http://www.jst-mfg.com/product/pdf/eng/eXH.pdf?src-supplier=Digi-Key, ComponentLink2Description=https://www.verical.com/server-webapp/html/getDatasheet?partID=640571&src-supplier=Verical, ComponentLink2URL=https://www.verical.com/server-webapp/html/getDatasheet?partID=640571&src-supplier=Verical, ComponentLink3Description=http://www.jst-mfg.com/product/pdf/eng/eXH.pdf?src-supplier=Future+Electronics, ComponentLink3URL=http://www.jst-mfg.com/product/pdf/eng/eXH.pdf?src-supplier=Future+Electronics, ComponentLink4Description=https://www.verical.com/server-webapp/html/getDatasheet?partID=455616&src-supplier=Verical, ComponentLink4URL=https://www.verical.com/server-webapp/html/getDatasheet?partID=455616&src-supplier=Verical, Connector Type="Male Pin", Contact Material=Brass, Contact Plating=Tin,Copper,Lead, Contact Type="Male Pin", Depth=5.75mm, Gender=Male, Housing Material=Polyamide, Lead Free="Lead Free", Lead Pitch=2.5mm, Length=12.4mm, Manufacturer Part Number=B4B-XH-A(LF)(SN), Material=Polyamide, Max Current Rating=3A, Max Voltage Rating (DC)=250V, Mount="Through Hole", Number of Contacts=4, Number of Positions=4, Number of Rows=1, Orientation=Straight, Packaging=Bulk, Pitch=2.5mm, REACH SVHC="No SVHC", Series=XH, Stock 1=0, Supplier 1=Digi-Key, Termination=Press-Fit, Voltage Rating=250V, Voltage Rating (AC)=250V, Wire/Cable Gauge=22AWG
J30: "CONN HEADER VERT 3POS 2.5MM", Color=Natural, Contact Resistance=20mR, Current Rating=3A, Flammability Rating="UL94 V-0", Housing Color=White, Insulation Resistance=1GR, Manufacturer=JST, Max Operating Temperature=85°C, Max Voltage Rating (AC)=250V, Min Operating Temperature=-25°C, Supplier Part Number 1=455-2248-ND, ComponentLink1Description=https://www.verical.com/server-webapp/html/getDatasheet?partID=640434&src-supplier=Verical, ComponentLink1URL=https://www.verical.com/server-webapp/html/getDatasheet?partID=640434&src-supplier=Verical, ComponentLink2Description=https://www.verical.com/server-webapp/html/getDatasheet?partID=440399&src-supplier=Verical, ComponentLink2URL=https://www.verical.com/server-webapp/html/getDatasheet?partID=440399&src-supplier=Verical, Connector Type=Header, Contact Finish - Mating=TIN, Contact Material=Brass, Contact Plating=Tin,Lead,Copper, Contact Shape=Square, Contact Type="Male Pin", Depth=5.75mm, Fastening Type=Detent, Gender=Male, Housing Material=Polyamide, Insulation Color=Natural, Insulation Material=Nylon, Lead Free="Lead Free", Lead Pitch=2.5mm, Length=9.9mm, Manufacturer Part Number=B3B-XH-A(LF)(SN), Max Current Rating=3A, Max Voltage Rating (DC)=250V, Mount="Through Hole", Number of Contacts=3, Number of Positions=3, Number of Rows=1, Orientation=Straight, Packaging=Bulk, Pitch=2.5mm, Pricing 1="1=0.19, 10=0.181, 25=0.1344, 50=0.1154, 250=0.09612, 750=0.08652, 1000=0.08075, 12000=0.06152, 24000=0.05575 (USD)", REACH SVHC="No SVHC", Series=XH, Stock 1=3453, Supplier 1=Digi-Key, Termination=Solder, Voltage Rating=250V, Voltage Rating (AC)=250V, Wire/Cable Gauge=22AWG
L1: library part 74437368033, "FIXED IND 3.3UH 8A 11.8 MOHM SMD", Case/Package=Nonstandard, Current Rating=8A, DC Resistance (DCR)=11.8mR, Frequency=22MHz, Inductance Tolerance=20%, Manufacturer="Wurth Electronics", Max Operating Temperature=125°C, Min Operating Temperature=-40°C, Package Quantity=500, Resistor Type=Wirewound, Saturation Current=23A, Series Resistance=11.8MR, Supplier Part Number 1=732-3388-1-ND, Test Frequency=100kHz, Category="Fixed Inductors", ComponentLink1Description=http://www.farnell.com/datasheets/1735871.pdf?src-supplier=Element14, ComponentLink1URL=http://www.farnell.com/datasheets/1735871.pdf?src-supplier=Element14, ComponentLink2Description=http://www.mouser.com/ds/2/445/74437368022-538992.pdf?src-supplier=Mouser, ComponentLink2URL=http://www.mouser.com/ds/2/445/74437368022-538992.pdf?src-supplier=Mouser, ComponentLink3Description=http://katalog.we-online.de/pbs/datasheet/74437368022.pdf?src-supplier=Digi-Key, ComponentLink3URL=http://katalog.we-online.de/pbs/datasheet/74437368022.pdf?src-supplier=Digi-Key, ComponentLink4Description=http://documents.rs-components.com/techlib://itc_doclist_GB.htm?stockno=7568629&src-supplier=RSComponents, ComponentLink4URL=http://documents.rs-components.com/techlib://itc_doclist_GB.htm?stockno=7568629&src-supplier=RSComponents, ComponentLink5Description=http://www.produktinfo.conrad.com/datenblaetter/1000000-1099999/001087607-da-01-ml-WE_LHMI_SMD_SPEICHERDROSSEL_744373_de_en.pdf?src-supplier=Conrad, ComponentLink5URL=http://www.produktinfo.conrad.com/datenblaetter/1000000-1099999/001087607-da-01-ml-WE_LHMI_SMD_SPEICHERDROSSEL_744373_de_en.pdf?src-supplier=Conrad, ComponentLink6Description=https://datasheet.ciiva.com/7354/74437368033-7354466.pdf?src-supplier=Newark, ComponentLink6URL=https://datasheet.ciiva.com/7354/74437368033-7354466.pdf?src-supplier=Newark, ComponentLink7Description=https://datasheet.ciiva.com/7691/1735872-7691596.pdf?src-supplier=Element14, ComponentLink7URL=https://datasheet.ciiva.com/7691/1735872-7691596.pdf?src-supplier=Element14, ComponentLink8Description=https://datasheet.ciiva.com/4961/74437368033-89775-4961151.pdf?src-supplier=Mouser, ComponentLink8URL=https://datasheet.ciiva.com/4961/74437368033-89775-4961151.pdf?src-supplier=Mouser, ComponentLink9Description=https://datasheet.ciiva.com/6693/74437368033-6693468.pdf?src-supplier=Digi-Key, ComponentLink9URL=https://datasheet.ciiva.com/6693/74437368033-6693468.pdf?src-supplier=Digi-Key, ComponentLink10Description=https://datasheet.ciiva.com/6693/74437368033-6693470.pdf?src-supplier=Digi-Key, ComponentLink10URL=https://datasheet.ciiva.com/6693/74437368033-6693470.pdf?src-supplier=Digi-Key, ComponentLink11Description=https://datasheet.ciiva.com/6693/74437368033-6693471.pdf?src-supplier=Digi-Key, ComponentLink11URL=https://datasheet.ciiva.com/6693/74437368033-6693471.pdf?src-supplier=Digi-Key, ComponentLink12Description=https://datasheet.ciiva.com/48690/001087608-da-01-ml-we-lhmi-smd-speicherdrossel-744373-de-en-48690487.pdf?src-supplier=Conrad, ComponentLink12URL=https://datasheet.ciiva.com/48690/001087608-da-01-ml-we-lhmi-smd-speicherdrossel-744373-de-en-48690487.pdf?src-supplier=Conrad, Core Material=Ferrite,Composite, Depth=10mm, Height=3.8mm, Height - Seated (Max)=0.157inch, Inductance=3.3uH, Length=11mm, Manufacturer Part Number=74437368033, Max DC Current=8A, Mount="Surface Mount", Packaging="Tape and Reel", Pricing 1="1=2.41000, 10=2.35900, 50=2.17700, 100=1.99600, 250=1.90500 (USD)", REACH SVHC=Unknown, RMS Current (Irms)=8A, RoHS=Yes, RoHS Compliant=Yes, Self Resonant Frequency=22MHz, Series=WE-LHMI, Shielding=Shielded, Stock 1=1240, Supplier 1=Digi-Key, Termination=SMD/SMT, Tolerance=20%, Width=10mm